# Altium PCB PCB1.PcbDoc
Units mil, origin at the board's own origin, x right, y up, seen from the top; angles counter-clockwise.
Board outline 3815.84 x 3849.16 mil, 2 copper layers (Top Layer, Bottom Layer); 81 components, 56 nets, 312 pads, 294 vias.
Unrouted connection lines stored in the file: 62.
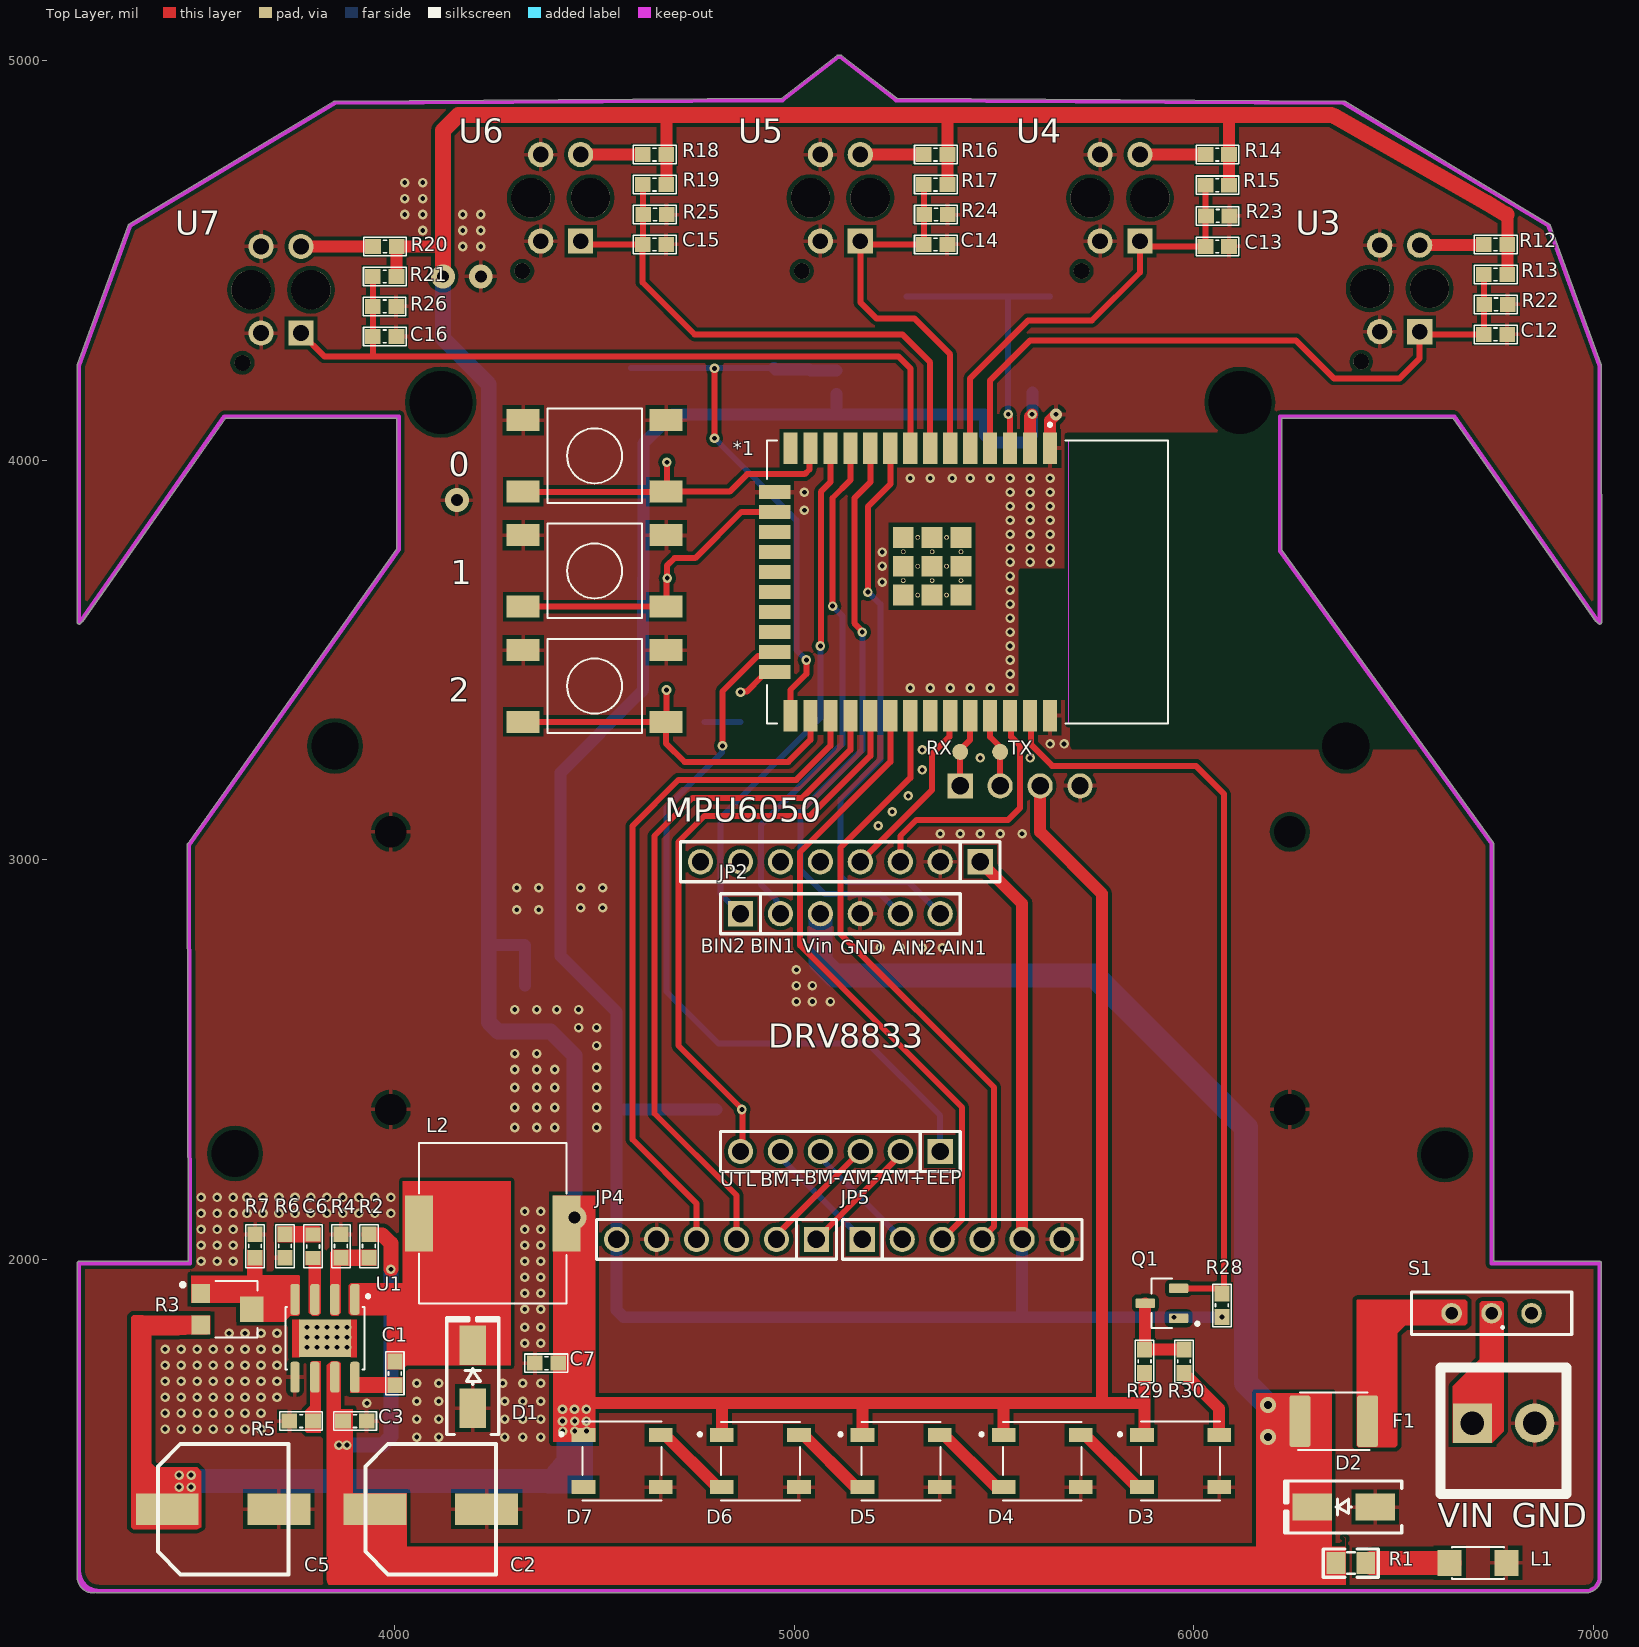
[diagram p0: Top Layer view]
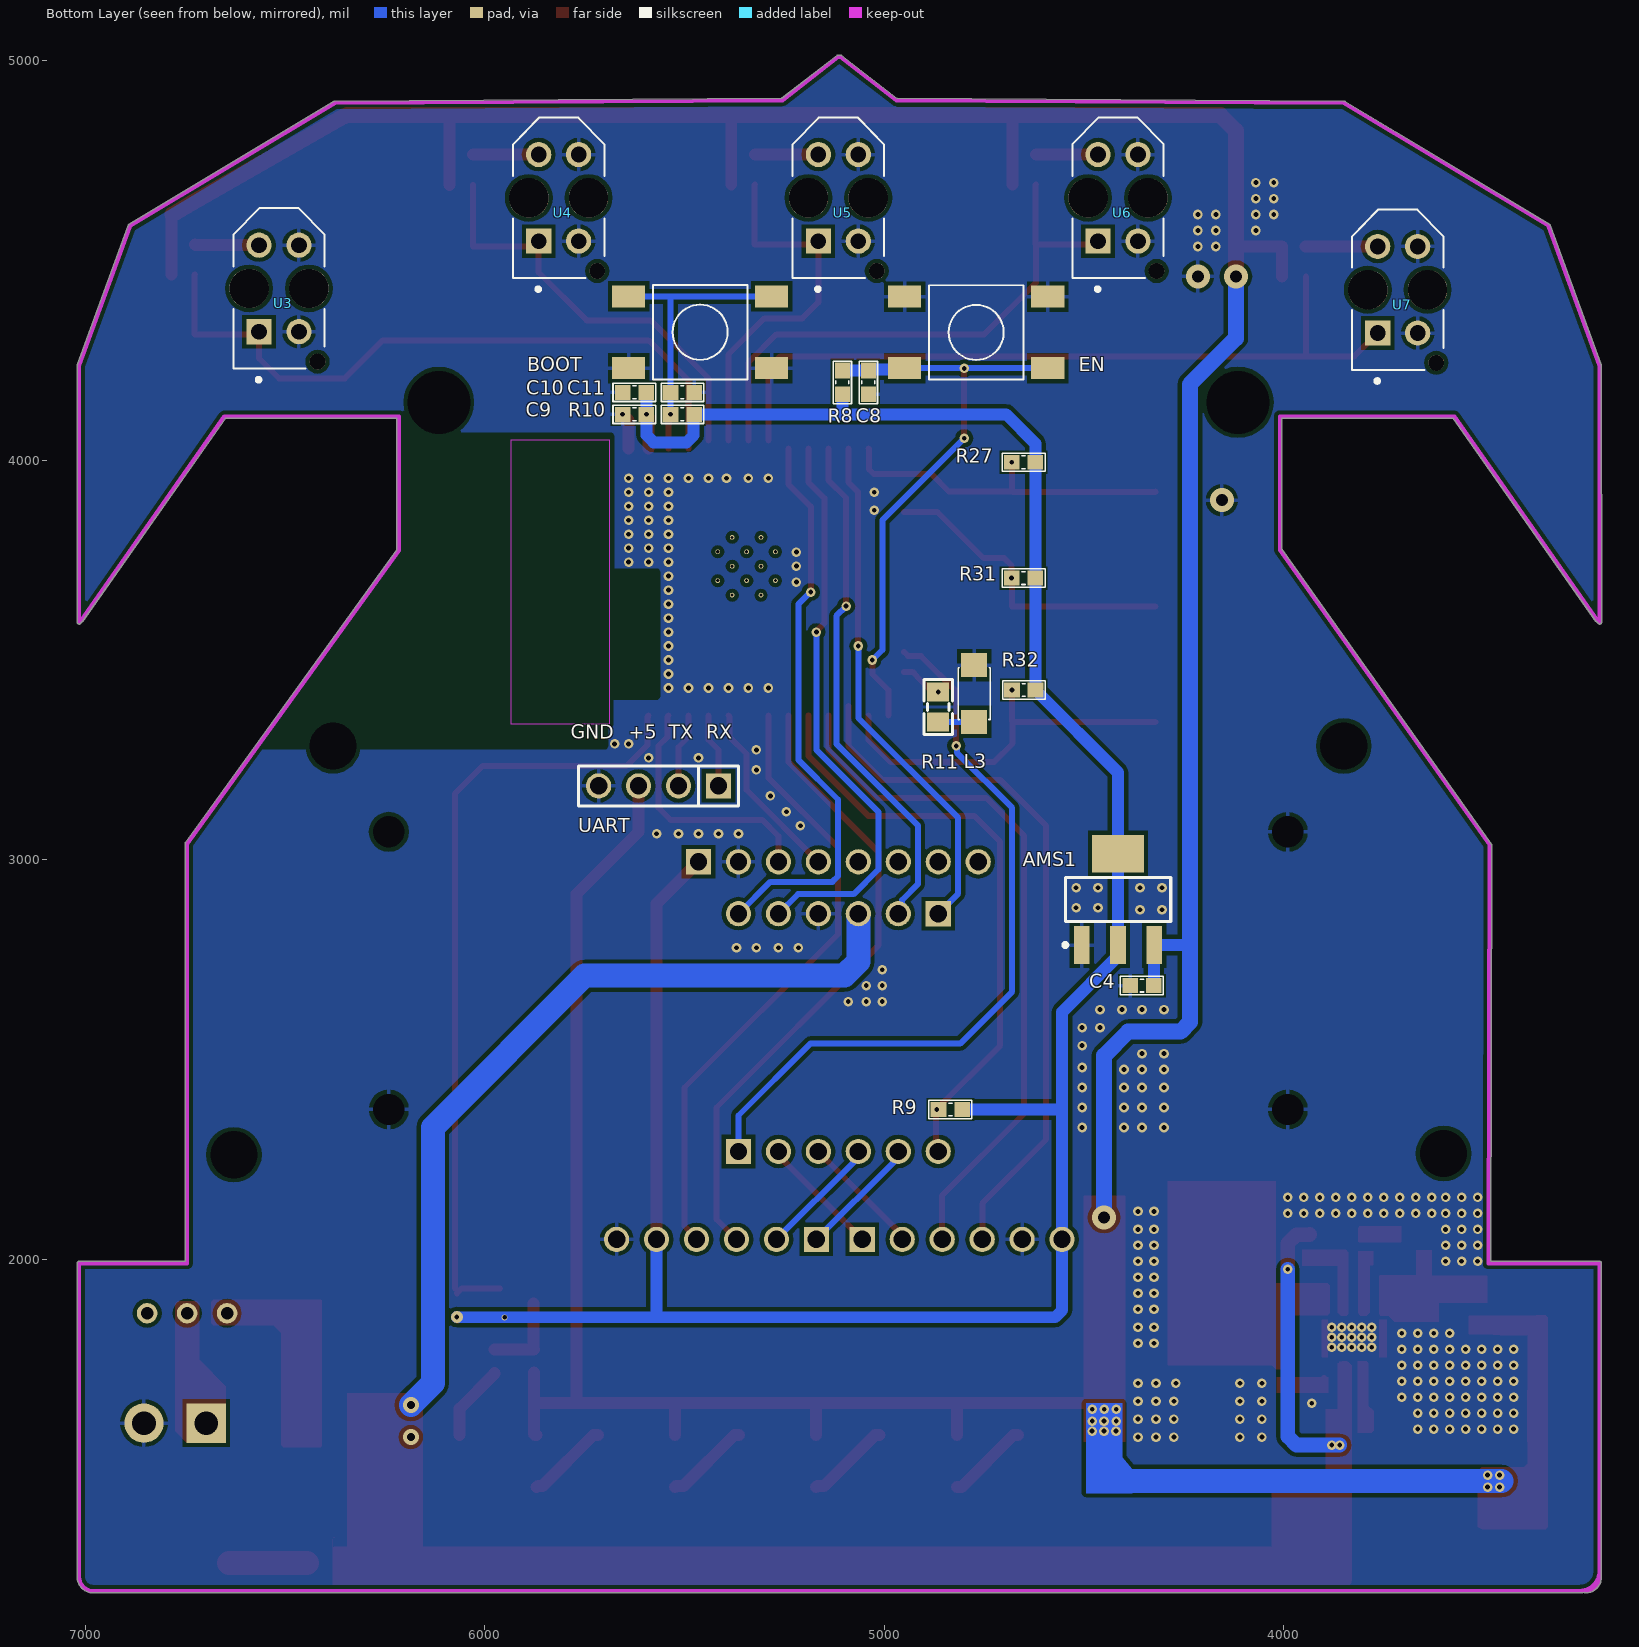
[diagram p1: Bottom Layer view, seen from below]
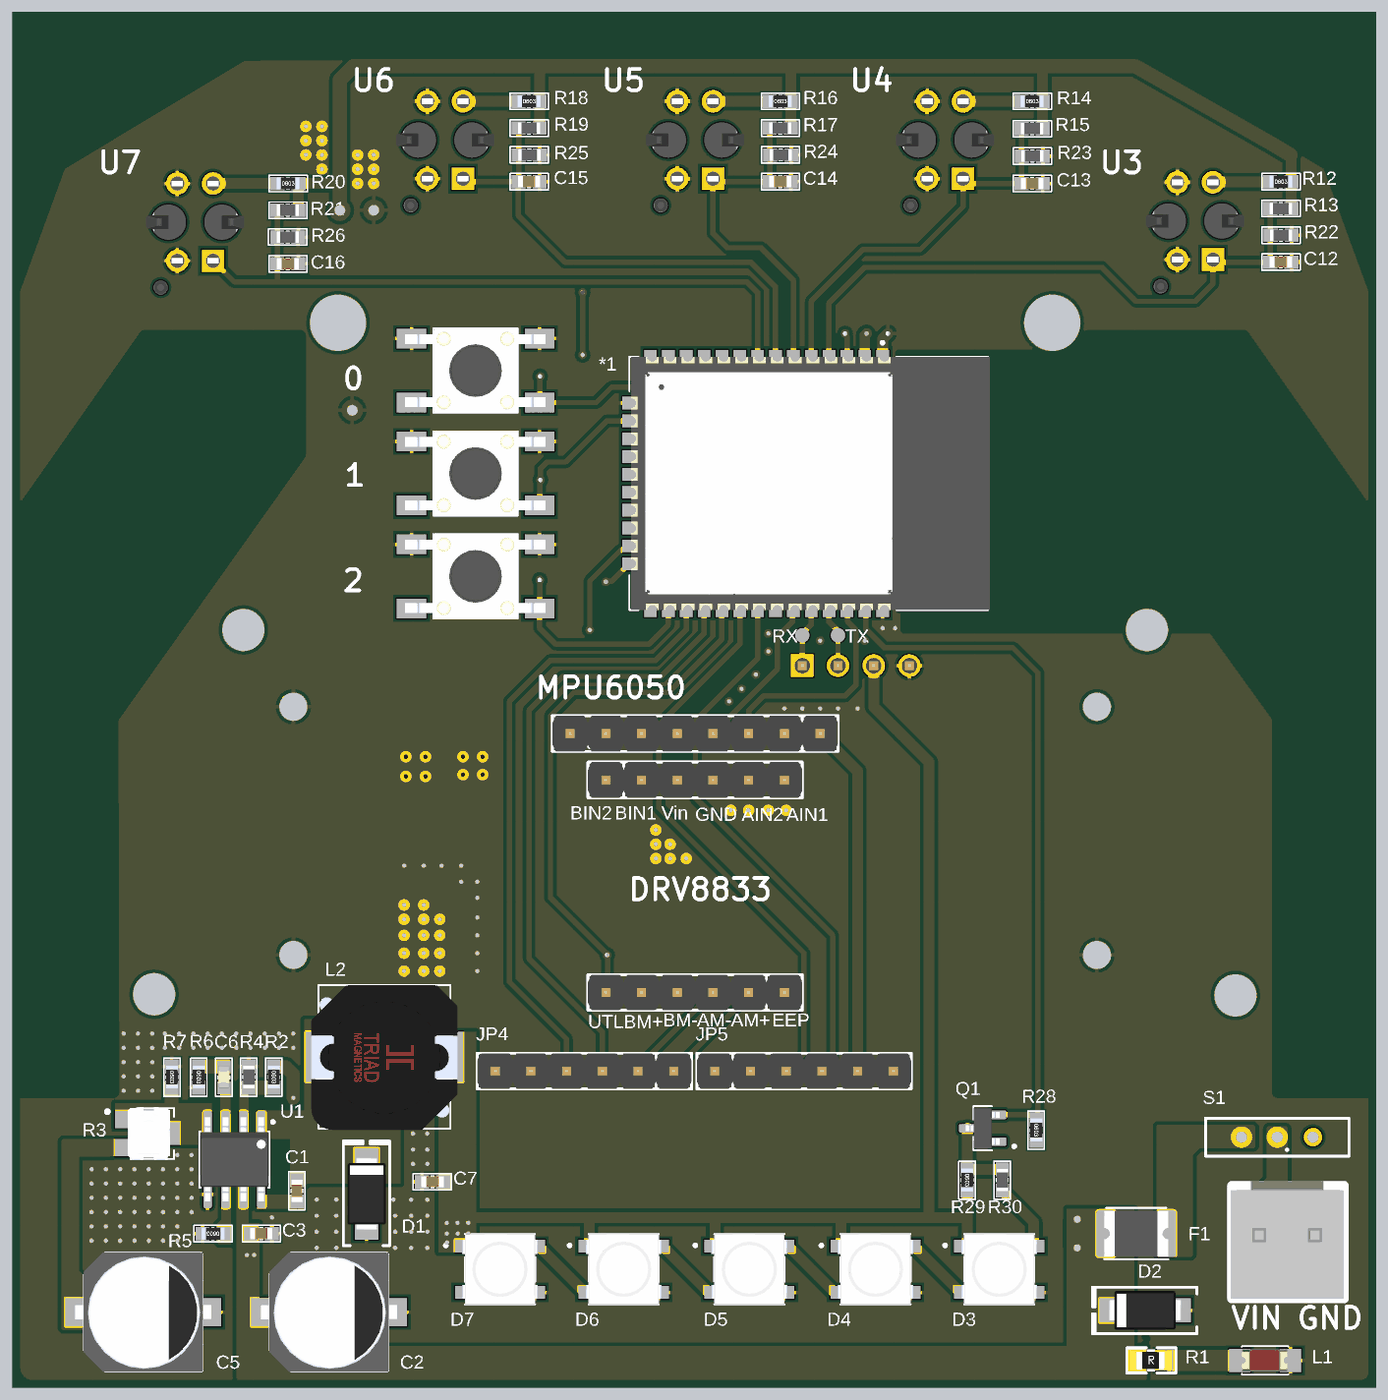
[diagram p2: 3D render of the assembled board from above, using the file's embedded part models]
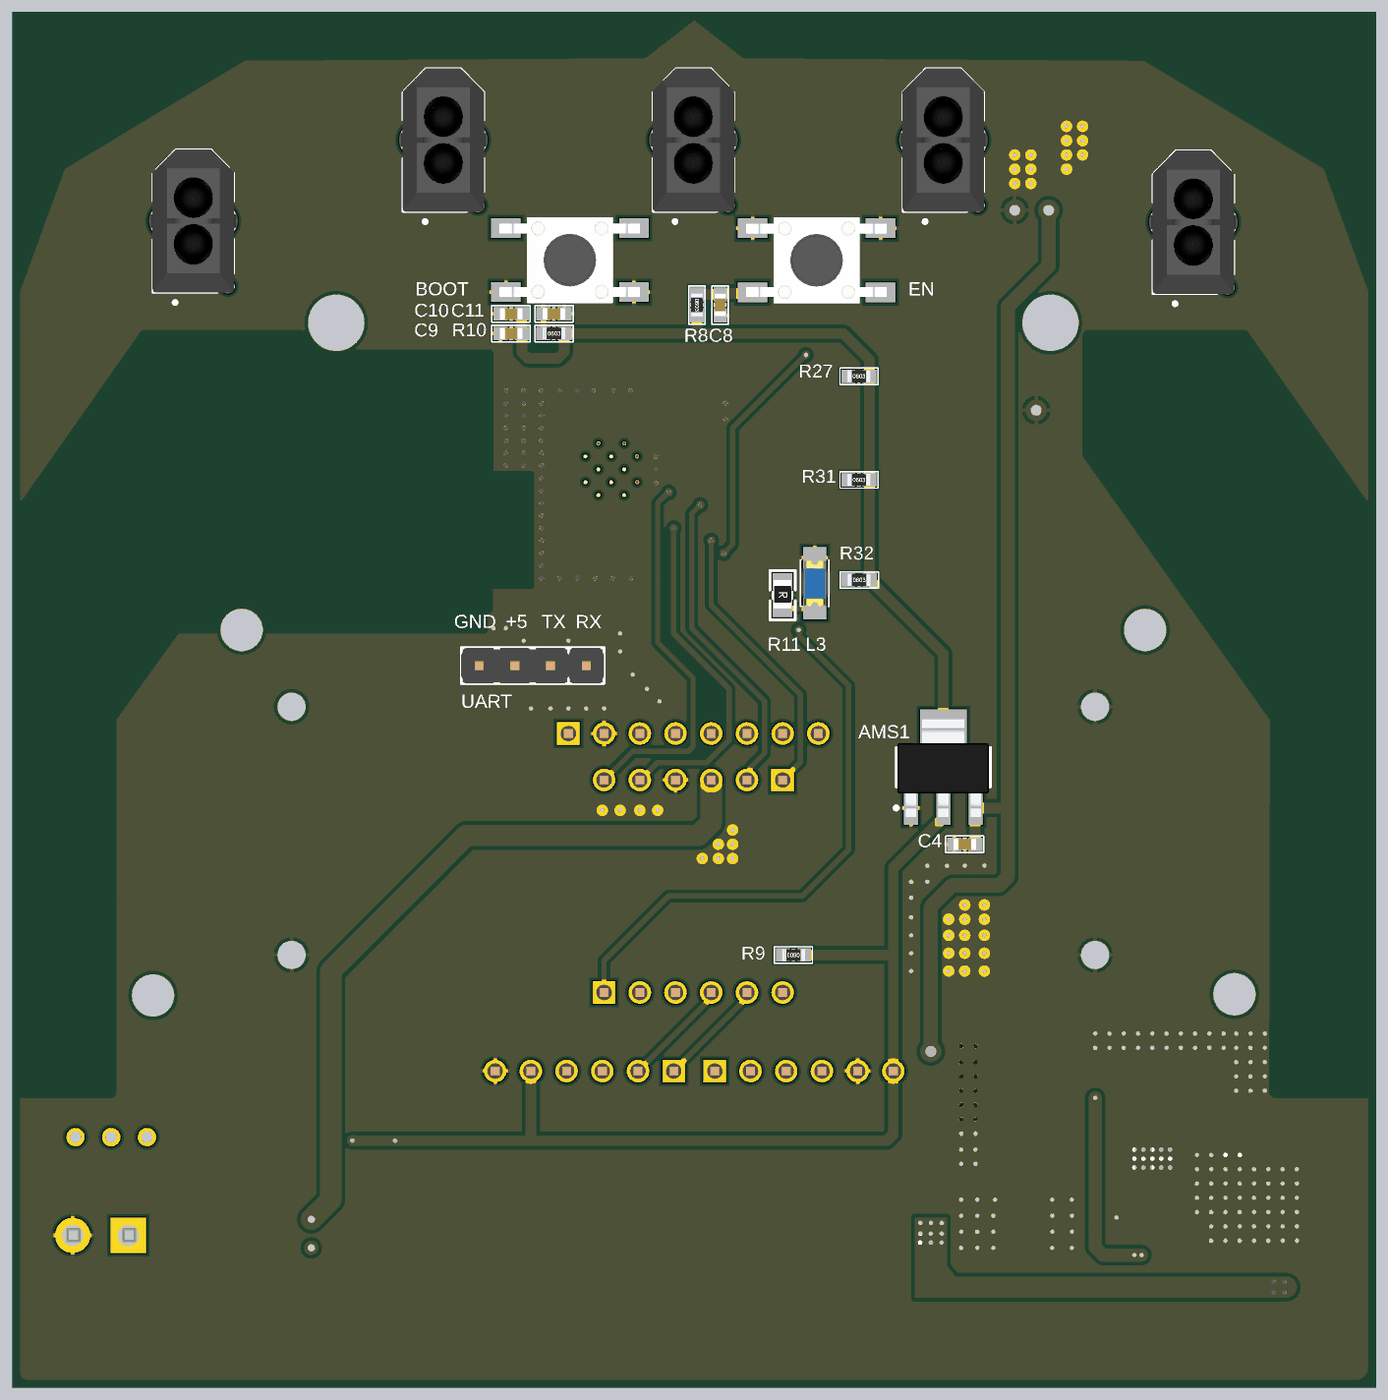
[diagram p3: 3D render of the assembled board from below, using the file's embedded part models]

## Layer stack, top to bottom
Top Solder: solder mask 0.4, Solder Resist, Dk 3.5
Top Layer: signal copper 1.4
Dielectric 1: dielectric 12.6, FR-4, Dk 4.8
Bottom Layer: signal copper 1.4
Bottom Solder: solder mask 0.4, Solder Resist, Dk 3.5

## Board outline
3204.99,1990 cw(c3210,1990) 3210,1995.02 3482.4,1995.02 3480.06,3037.07 cw(c3485.07,3037.09) 3481,3040.01 4004.99,3777.69 4004.99,4104.98 3575.91,4104.69 3219.1,3597.12 cw(c3215,3600) 3214.61,3595 cw(c3209.6,3595) 3204.58,3595 3205.02,4236.61 cw(c3210.03,4236.61) 3205.32,4238.33 3332.99,4588.03 cw(c3337.7,4586.31) 3335.13,4590.61 3846.79,4898.02 cw(c3849.39,4893.72) 3849.36,4898.74 4968.13,4905.52 5106.93,5013.09 cw(c5110.01,5009.13) 5112.5,5013.48 cw(c5114.99,5009.13) 5118.07,5013.09 5256.52,4905.79 6375.17,4899.01 6375.19,4899.01 ccw(c6375.18,4898.84) 6375.17,4899.01 cw(c6375.15,4893.99) 6377.75,4898.29 6889.87,4590.61 cw(c6887.3,4586.31) 6892.01,4588.03 7019.68,4238.33 cw(c7014.97,4236.61) 7019.98,4236.61 7020.42,3595 cw(c7015.4,3595) 7010.39,3595 cw(c7010,3600) 7005.9,3597.12 6649.09,4104.69 6220.02,4104.98 6220.02,3775.73 6749.07,3042.94 cw(c6745,3040) 6750.02,3040 6750.02,1995.02 7015,1995.02 cw(c7015,1990) 7020.02,1990 cw(c7016.81,1989.99) 7020.01,1989.94 7020.01,1205 ccw(c7015,1205.03) 7020.01,1205.06 7020.02,1205 cw(c6980,1205) 6987.6,1165.71 cw(c6985,1170) 6985,1164.98 3260,1164.98 cw(c3260,1220) 3248.32,1166.24 cw(c3245,1170) 3245,1164.98 cw(c3245,1205) 3204.99,1205

## Design rules (kind name [scope] priority, off if disabled: settings)
Clearance [All] p1: gap=10 ignorepadtopadclearanceinfootprint=FALSE except(0: Arc-Hole Track-Hole SMDPad-Hole THPad-Hole Via-Hole Fill-Hole Poly-Hole Region-Hole Text-Hole)
PolygonConnect [All] p1: connectstyle=Relief reliefconductorwidth=10 reliefentries=4 polygonreliefangle="90 Angle" airgapwidth=10
RoutingVias RoutingVias_1 [All] p1: holewidth=12 width=24 viastyle="Through Hole" minholewidth=8 minwidth=10 maxholewidth=12 maxwidth=30
SolderMaskExpansion [All] p1: expansion=4 istentingtop=FALSE
Width [All] p1: maxlimit=60 minlimit=15 preferedwidth=30
30 further rules are at their usual default settings.

## Components (designator, comment, footprint, x,y, rotation, side; value= is the part's Value field where it differs from the comment)
0 "SW" "SW4 - SMD" 4500,4011.13 r180 top value="Button chip 4 pin" (schematic designator SW3)
1 "SW" "SW4 - SMD" 4500,3723.06 r180 top value="Button chip 4 pin" (schematic designator SW4)
2 "SW" "SW4 - SMD" 4500,3435 r180 top value="Button chip 4 pin" (schematic designator SW5)
*1 "ESP32 WROOM 32" ESP32-WROOM-32D 5432.91,3695.35 r270 top
AMS1 "AMS1117-3.3V" SOT223 4415,2900.83 r180 bottom value="AMS1117-3.3V SOT223"
BOOT "SW" "SW4 - SMD" 5460.87,4320.43 r0 bottom value="Button chip 4 pin" (schematic designator SW2)
C1 "104" "tu 0603" 4000,1714.53 r90 top
C2 "220uF" "tu nhom 8 (f)" 4090,1375 r0 top
C3 "106" "tu 0603" 3900,1595 r0 top
C4 "106" "tu 0603" 4355,2685 r0 bottom
C5 "220uF" "tu nhom 8 (f)" 3570,1375 r0 top
C6 "150pF" "Cap 0603" 3795,2032.59 r90 top
C7 "106" "tu 0603" 4379.53,1740 r180 top
C8 "104" "tu 0603" 5040,4195 r270 bottom
C9 "106" "tu 0603" 5625,4115 r0 bottom
C10 "104" "tu 0603" 5625,4170 r0 bottom
C11 "104" "tu 0603" 5505.47,4170 r180 bottom
C12 "104" "tu 0603" 6755,4315 r0 top
C13 "104" "tu 0603" 6058.53,4535 r0 top
C14 "104" "tu 0603" 5353.53,4540 r0 top
C15 "104" "tu 0603" 4650,4540 r0 top
C16 "104" "tu 0603" 3974.53,4310 r0 top
D1 "SS34" "DIODE SMA" 4195,1706.26 r90 top
D2 "SS34" "DIODE SMA" 6375,1380 r180 top
D3 "ADA1655" LED_ADA1655 5966.46,1495.04 r0 top
D4 "ADA1655" LED_ADA1655 5620,1495 r0 top
D5 "ADA1655" LED_ADA1655 5266.95,1495 r0 top
D6 "ADA1655" LED_ADA1655 4915,1495 r0 top
D7 "ADA1655" LED_ADA1655 4568.54,1495.04 r0 top
DRV8833 "8833A" "JP 1x6 DT" 5365,2270 r180 top (schematic designator JP1)
EN "SW" "SW4 - SMD" 4770,4320 r180 bottom value="Button chip 4 pin" (schematic designator SW1)
F1 "2A 24V" "Cau chi tu phuc hoi 2A 24V SMD1812" 6350,1595 r180 top
H? "Header 2P VH3.96 Duc Thang" VH3.96M-2 6775,1590 r0 top
JP2 "8833B" "JP 1x6 DT" 4865,2865 r0 top
JP4 "EncoderA" "JP 1x6 DT" 5055,2050 r180 top
JP5 "EncoderB" "JP 1x6 DT" 5170,2050 r0 top
L1 "LED 0805" LED-1206-Red 6640,1240 r0 top
L2 "MSS1038-153MLC" IND_370_401_140X70_SMD 4059.92,2090 r90 top
L3 "LED 1206" LED-1206-Blue 4775,3345 r90 bottom
MPU6050 "mpu6050" "JP 1x8 DT" 5465,2995 r180 top (schematic designator JP?)
Q1 "BSS138" SOT95P240X111-3N 5920,1890 r180 top
R1 "1k" "tro smd 0805" 6392.43,1242.39 r0 top
R2 "100k" "tro smd 0603" 3935,2033.29 r270 top
R3 "TC33X-2-104E" TRIM_TC33X-2-502G 3585,1875 r0 top
R4 "30k" "RES 0603" 3865,2033.29 r270 top
R5 "100k" "tro smd 0603" 3765.47,1595 r180 top
R6 "100k" "tro smd 0603" 3725,2033.29 r270 top
R7 "10k" "tro smd 0603" 3650,2033.29 r270 top
R8 "10k" "tro smd 0603" 5105,4195 r270 bottom
R9 "10k" "tro smd 0603" 4834.53,2375 r0 bottom
R10 "10k" "tro smd 0603" 5505.47,4115 r180 bottom
R11 "330R" "Tro SMD 0805" 4862.61,3382.57 r270 bottom
R12 "330R" "tro smd 0603" 6755,4540 r0 top
R13 "5.1k" "RES 0603" 6755,4465 r0 top
R14 "330R" "tro smd 0603" 6058.53,4765 r0 top
R15 "5.1k" "RES 0603" 6058.53,4688.33 r0 top
R16 "330R" "tro smd 0603" 5353.53,4765 r0 top
R17 "5.1k" "RES 0603" 5353.53,4690 r0 top
R18 "330R" "tro smd 0603" 4650,4765 r0 top
R19 "5.1k" "RES 0603" 4650,4690 r0 top
R20 "330R" "tro smd 0603" 3975,4535 r0 top
R21 "5.1k" "RES 0603" 3974.53,4460 r0 top
R22 "9.1k" "RES 0603" 6756,4390 r180 top
R23 "9.1k" "RES 0603" 6059.53,4611.67 r180 top
R24 "9.1k" "RES 0603" 5354.53,4615 r180 top
R25 "9.1k" "RES 0603" 4651,4615 r180 top
R26 "9.1k" "RES 0603" 3974.53,4385 r180 top
R27 "10k" "tro smd 0603" 4651.42,3995 r180 bottom
R28 "10k" "tro smd 0603" 6070,1885 r270 top
R29 "10k" "tro smd 0603" 5876.5,1744.84 r270 top
R30 "470R" "RES 0603" 5975,1744.84 r270 top
R31 "10k" "tro smd 0603" 4651.42,3705 r180 bottom
R32 "10k" "tro smd 0603" 4650.94,3425 r180 bottom
S1 "450301014042" 450301014042 6745,1865 r180 top
U1 "MP1584EN" SOIC127P600X170-9N 3825,1802.44 r270 top
U3 "TCRT5000L" XDCR_TCRT5000L 6515,4430 r90 bottom
U4 "TCRT5000L" XDCR_TCRT5000L 5815,4656.73 r90 bottom
U5 "TCRT5000L" XDCR_TCRT5000L 5115,4656.73 r90 bottom
U6 "TCRT5000L" XDCR_TCRT5000L 4415,4656.73 r90 bottom
U7 "TCRT5000L" XDCR_TCRT5000L 3715,4426.73 r90 bottom
UART "UART" "JP 1x4 DT" 5415,3185 r0 bottom (schematic designator JP3)

## Footprints (in the part's own frame and the unit in brackets; to place one, negate y for a bottom-side part, rotate by r counter-clockwise, add the part's x,y. Pads: shape width x height; smd on the part's side, far side on the other; paste and mask are expansions set on the pad)
450301014042 [mm]
  round 1.308 hole 0.8: 1(0,0) 2(-2.54,0) 3(2.54,0)
  silkscreen extent -5.1,-1.35 5.1,1.35
"Cap 0603" [mil]
  rect 35x37.4 smd mask+3: 1(-29.83,-0.32) 2(29.23,-0.32)
  silkscreen extent -53,-23 54,23, body extent -30,-16 32,15, height 31
"Cau chi tu phuc hoi 2A 24V SMD1812" [mm]
  rrect25% 1.34x3.29 smd: 1(-2.15,0) 2(2.15,0)
  silkscreen extent -2.28,-1.83 2.28,1.83, body extent -2.27,-1.62 2.27,1.62, height 1.25
"DIODE SMA" [mm] "SMA"
  rect 2.5x1.7 smd: 1(-2,0) 2(2,0)
  silkscreen extent -3.68,-1.65 3.75,1.65, body extent -2.6,-1.37 2.6,1.37, height 2.4
ESP32-WROOM-32D [mm]
  rect 2x0.9 smd: 1(-8.5,5.26) 2(-8.5,3.99) 3(-8.5,2.72) 4(-8.5,1.45) 5(-8.5,0.18) 6(-8.5,-1.09) 7(-8.5,-2.36) 8(-8.5,-3.63) 9(-8.5,-4.9) 10(-8.5,-6.17) 11(-8.5,-7.44) 12(-8.5,-8.71) 13(-8.5,-9.98) 14(-8.5,-11.25) 25(8.5,-11.25) 26(8.5,-9.98) 27(8.5,-8.71) 28(8.5,-7.44) 29(8.5,-6.17) 30(8.5,-4.9) 31(8.5,-3.63) 32(8.5,-2.36) 33(8.5,-1.09) 34(8.5,0.18) 35(8.5,1.45) 36(8.5,2.72) 37(8.5,3.99) 38(8.5,5.26)
  rect 0.9x2 smd: 15(-5.715,-12.25) 16(-4.445,-12.25) 17(-3.175,-12.25) 18(-1.905,-12.25) 19(-0.635,-12.25) 20(0.635,-12.25) 21(1.905,-12.25) 22(3.175,-12.25) 23(4.445,-12.25) 24(5.715,-12.25)
  rect 1.33x1.33 smd: 39(-2.835,-0.405) 39(-2.835,-2.24) 39(-2.835,-4.075) 39(-1,-0.405) 39(-1,-2.24) 39(-1,-4.075) 39(0.835,-0.405) 39(0.835,-2.24) 39(0.835,-4.075)
  round 0.3 hole 0.2: 39(-2.835,-1.322) 39(-2.835,-3.157) 39(-1.917,-0.405) 39(-1.917,-2.24) 39(-1.917,-4.075) 39(-1,-1.322) 39(-1,-3.157) 39(-0.082,-0.405) 39(-0.082,-2.24) 39(-0.082,-4.075) 39(0.835,-1.322) 39(0.835,-3.157)
  Keep-Out Layer region: 9,6.45 -9,6.45 -9,12.75 9,12.75
  Keep-Out Layer region: 9,6.45 -9,6.45 -9,12.75 9,12.75
  silkscreen extent -10.1,-12.75 9,12.75, body extent -9,-12.62 9,12.88, height 3.2
IND_370_401_140X70_SMD [mm] "SMD INDUCTOR"
  rect 3.56x1.78 smd: 1(0,0) 2(0,-9.4)
  silkscreen extent -5.1,-9.4 5.1,0, body extent -5.2,-9.9 5.1,0.5, height 4.01
"JP 1x4 DT" [mm] "4 pins, 1 row, straight, gold plating"
  rect 1.6x1.6 hole 1.1: 1(0,0)
  round 1.6 hole 1.1: 2(2.54,0) 3(5.08,0) 4(7.62,0)
  silkscreen extent -1.27,-1.27 8.89,1.27, body extent -1.27,-1.27 8.89,1.27, height 8.54
"JP 1x6 DT" [mm] "6 pins, 1 row, straight, gold plating"
  rect 1.6x1.6 hole 1.1: 1(0,0)
  round 1.6 hole 1.1: 2(2.54,0) 3(5.08,0) 4(7.62,0) 5(10.16,0) 6(12.7,0)
  silkscreen extent -1.27,-1.27 13.97,1.27, body extent -1.27,-1.27 13.97,1.27, height 8.54
"JP 1x8 DT" [mm] "8 pins, 1 row, straight, gold plating"
  rect 1.6x1.6 hole 1.1: 1(0,0)
  round 1.6 hole 1.1: 2(2.54,0) 3(5.08,0) 4(7.62,0) 5(10.16,0) 6(12.7,0) 7(15.24,0) 8(17.78,0)
  silkscreen extent -1.27,-1.27 19.05,1.27, body extent -1.27,-1.27 19.05,1.27, height 8.54
LED-1206-Blue [mil] "Compoment SMD 120x60mil"
  rect 60x65 smd: 1(0,0) 2(142,0)
  silkscreen extent 6,-40 136,40, body extent 7,-31 133,31, height 43
LED-1206-Red [mil]
  rect 60x65 smd: 1(0,0) 2(142,0)
  silkscreen extent 6,-40 136,40, body extent 7,-31 133,31, height 43
LED_ADA1655 [mm]
  rect 1.5x0.9 smd: 1(-2.45,1.65) 2(-2.45,-1.65) 3(2.45,-1.65) 4(2.45,1.65)
  silkscreen extent -3.95,-2.5 2.5,2.5, body extent -2.7,-2.5 2.7,2.5, height 1.5
"RES 0603" [mm] "RES 0603"
  rect 1x0.95 smd mask+0.076: 1(-0.75,0) 2(0.75,0)
  silkscreen extent -1.35,-0.58 1.37,0.58, body extent -0.8,-0.4 0.8,0.4, height 0.45
SOIC127P600X170-9N [mm]
  rrect54% 1.97x0.6 smd: 1(-2.475,1.905) 2(-2.475,0.635) 3(-2.475,-0.635) 4(-2.475,-1.905) 5(2.475,-1.905) 6(2.475,-0.635) 7(2.475,0.635) 8(2.475,1.905)
  rect 2.41x3.3 smd paste-3: 9(0,0)
  silkscreen extent -2.77,-2.5 2,2.84, body extent -3,-2.45 3,2.45, height 1.7
SOT95P240X111-3N [mm]
  rrect25% 1.23x0.6 smd: 1(-1.06,0.95) 2(-1.06,-0.95) 3(1.06,0)
  silkscreen extent -2.35,-1.57 0.65,1.57, body extent -1.2,-1.45 1.2,1.45, height 1.11
SOT223 [mm]
  rect 1x2.4 smd: 1(-2.3,-2.9) 2(0,-2.9) 3(2.3,-2.9)
  rect 3.3x2.4 smd: 4(0,2.9)
  silkscreen extent -3.48,-3.02 3.35,1.4, body extent -3.25,-3.56 3.25,3.4, height 1.68
"SW4 - SMD" [mm] "SW button 4pin, 250 x250 mil"
  rect 2.1x1.4 smd: 1(-4.55,2.275) 2(4.55,-2.275) 3(4.55,2.275) 4(-4.55,-2.275)
  silkscreen extent -3,-3 3,3, body extent -5,-3 5,3, height 5.11
TRIM_TC33X-2-502G [mm]
  rect 1.2x1.2 smd: 1(-1.8,1) 3(-1.8,-1)
  rect 1.5x1.6 smd: 2(1.45,0)
  silkscreen extent -3.07,-1.8 1.8,1.8, body extent -1.5,-1.9 1.5,1.9, height 1.1
"tro smd 0603" [mm] "Chip Capacitor, 2-Leads, Body 1,60x0,80mm, IPC Medium Density"
  rect 1x0.95 smd mask+0.076: 1(-0.75,0) 2(0.75,0)
  silkscreen extent -1.35,-0.58 1.37,0.58, body extent -0.82,-0.42 0.82,0.43, height 0.44
"tro smd 0805" [mm]
  rect 1.2x1.4 smd: 1(-0.946,-0.061) 2(0.954,-0.061)
  silkscreen extent -1.75,-0.97 1.75,0.84, body extent -1.56,-0.76 1.44,0.64, height 0.53
"Tro SMD 0805" [mm]
  rect 1.2x1.4 smd: 1(-0.946,-0.061) 2(0.954,-0.061)
  silkscreen extent -1.75,-0.97 1.75,0.84, body extent -1.56,-0.76 1.44,0.64, height 0.53
"tu 0603" [mm] "Chip Capacitor, 2-Leads, Body 1,60x0,80mm, IPC Medium Density"
  rect 1x0.95 smd mask+0.076: 1(-0.75,0) 2(0.75,0)
  silkscreen extent -1.35,-0.58 1.37,0.58, body extent -0.8,-0.4 0.8,0.4, height 0.9
"tu nhom 8 (f)" [mm]
  rect 4x2 smd: 1(-3.55,0) 2(3.55,0)
  silkscreen extent -4.15,-4.15 4.15,4.15, body extent -4.85,-4.25 4.85,4.25, height 10.5
VH3.96M-2 [mm]
  rect 2.5x2.5 hole 1.5: 1(-1.98,0)
  round 2.5 hole 1.5: 2(1.98,0)
  silkscreen extent -4,-4.5 4,3.54, body extent -4.08,-4.49 3.96,3.88, height 10.26
XDCR_TCRT5000L [mm]
  rect 1.6x1.6 / inner round 1.6 / far side rect 1.6x1.6 hole 1: 1(-2.75,1.27)
  round 1.6 hole 1: 2(-2.75,-1.27) 3(2.75,-1.27) 4(2.75,1.27)
  round 1 hole 1 unplated: ""(-4.65,-2.45)
  round 2.5 hole 2.5 unplated: ""(0,-1.9) ""(0,1.9)
  silkscreen extent -5.92,-2.9 5.1,2.9, body extent -5.1,-3.5 5.1,3.5, height 7.2

## Part data
0 1 2 BOOT EN: library part SW4, "Switch button 4 pin"
AMS1: library part "AMS1117 SMD", "Dán", Chung_Loai=Dán, Don_Vi=Con, Ma_Hang=MH000596
C1 C8 C10 C11 C12 C13 C14 C15 C16: library part "Tu 0603 104 50V 10%", "Dán", Chung_Loai=Dán, Don_Vi=Con, Ma_Hang=MH004568, So_Chan=2, Ten_Linh_Kien="Tụ 0603 104-100nF 10% 50V"
C2 C5: library part "Tu Nhom 220uF 25V", "Dán", Chung_Loai=Dán, Don_Vi=Con, Ma_Hang=MH002221, So_Chan=2, Ten_Linh_Kien="Tụ Nhôm 220uF 25V"
C3 C4 C7 C9: library part "Tu 0603 106 16V 20%", "Dán", Chung_Loai=Dán, Don_Vi=Con, Ma_Hang=MH004848, So_Chan=2, Ten_Linh_Kien="Tụ 0603-10uF 20% 16V"
C6: library part "Tu 0805 15pF 50V 10%", "Dán", Chung_Loai=Dán, Don_Vi=Con, Ma_Hang=MH004556, So_Chan=2, Ten_Linh_Kien="Tụ 0805 15P 10% 50V"
D1 D2: library part "Diode SS34 ( 1N5822 )", "Dán", Chung_Loai=Dán, Don_Vi=Con, Ma_Hang=MH002104, Ten_Linh_Kien="Diode SS34 3A 40V SMA ( 1N5822 SS34A)"
D3 D4 D5 D6 D7: "WS2812B 5050 RGB LED with Integrated Driver Chip - 10 Pack", Package="5050 Worldsemi", Availability="No availability data", Check_prices=https://www.snapeda.com/parts/ADA1655/Adafruit%20Industries/view-part/48810/?ref=eda, MF="Adafruit Industries", MP=ADA1655, Price=None, SnapEDA_Link=https://www.snapeda.com/parts/ADA1655/Adafruit%20Industries/view-part/48810/?ref=snap
DRV8833 JP2 JP4 JP5: library part "JP 1x6 2.54 Duc Thang", "Cắm", Chung_Loai=Cắm, Don_Vi=Con, Ma_Hang=MH000903, Ten_Linh_Kien="Jump Đơn Đực 2.54MM 1x40P Thẳng 11MM"
F1: library part "Cau chi tu phuc hoi 2A 24V SMD1812", "2A 24V SMD1812", Ma_Hang=MH010033, Ten="Cầu Chì Tự Phục Hồi 2A 24V SMD1812"
H?: "Cắm", Chung_Loai=Cắm, Don_Vi=Con, Ma_Hang=MH001283, Ten_Linh_Kien="Header 2P XH2.54-2P Đực Thẳng"
L1: library part "LED 1206 Do", "Dán", Chung_Loai=Dán, Don_Vi=Con, Ma_Hang=MH002334, Ten_Linh_Kien="LED1206 Màu Đỏ (Red)"
L2: library part IND_15uH-3.8A-30%-SMD, "Fixed Inductors MSS1038 SMT Shielded 15 uH 20 % 3.8 A", Alternate Part Number-1=NA, Case/Package=SMD, Manufacturer=Bourns, Manufacturer Part Number=MSS1038-153MLC, Supplier Part Number-1=MSS1038-153MLC, Supplier-1="COILCRAFT SAMPLE"
L3: library part "LED 1206 Xanh Duong", "Dán", Chung_Loai=Dán, Don_Vi=Con, Ma_Hang=MH002333, Ten_Linh_Kien="LED1206 Màu Xanh Dương (Blue)"
MPU6050: library part "JP 1x8 2.54 Duc Thang", "Cắm", Chung_Loai=Cắm, Don_Vi=Con, Ma_Hang=MH000903, Ten_Linh_Kien="Jump Đơn Đực 2.54MM 1x40P Thẳng 11MM"
Q1: "N-Channel 50 V 220mA (Ta) 350mW (Ta) Surface Mount SOT-23-3", Package="SOT-23-3 ON Semiconductor", Check_prices=https://www.snapeda.com/parts/BSS138/Onsemi/view-part/?ref=eda, MF=onsemi, MP=BSS138, SnapEDA_Link=https://www.snapeda.com/parts/BSS138/Onsemi/view-part/?ref=snap
R1: library part "Tro 0805 1% 1k", "Dán", Chung_Loai=Dán, Don_Vi=Con, Ma_Hang=MH005468, So_Chan=2, Ten_Linh_Kien="Trở 0805 1% 1k"
R2 R5 R6: library part "Tro 0603 5% 100k", "Dán", Chung_Loai=Dán, Don_Vi=Con, Ma_Hang=MH006314, So_Chan=2, Ten_Linh_Kien="Trở 0603 5% 100k"
R3: library part TC33X-2-502G, "5 kOhms 0.1W, 1/10W J Lead Surface Mount Trimmer Potentiometer Cermet 1 Turn Top Adjustment", Package="SOD-23 Bourns", Check_prices=https://www.snapeda.com/parts/TC33X-2-502G/Bourns/view-part/1439711/?ref=eda, Digi-Key_Part_Number=TC33X-2-502GCT-ND, MF=Bourns, MP=TC33X-2-502G, Purchase-URL=https://pricing.snapeda.com/search/part/TC33X-2-502G/?ref=eda, SnapEDA_Link=https://www.snapeda.com/parts/TC33X-2-502G/Bourns/view-part/1439711/?ref=snap
R4: library part "Tro 0805 5% 30k", "Dán", Chung_Loai=Dán, Don_Vi=Con, Ma_Hang=MH005314, So_Chan=2, Ten_Linh_Kien="Trở 0805 5% 30k"
R7 R8 R9 R10 R27 R28 R29 R31 R32: library part "Tro 0603 5% 10k", "Dán", Chung_Loai=Dán, Don_Vi=Con, Ma_Hang=MH006316, So_Chan=2, Ten_Linh_Kien="Trở 0603 5% 10k"
R11: library part "Tro 0805 5% 330R", "Dán", Chung_Loai=Dán, Don_Vi=Con, Ma_Hang=MH005337, So_Chan=2, Ten_Linh_Kien="Trở 0805 5% 330R"
R12 R14 R16 R18 R20: library part "Tro 0603 5% 330R", "Dán", Chung_Loai=Dán, Don_Vi=Con, Ma_Hang=MH006910, So_Chan=2, Ten_Linh_Kien="Trở 0603 5% 330R"
R13 R15 R17 R19 R21: library part "Tro 0805 1% 5.1k", "Dán", Chung_Loai=Dán, Don_Vi=Con, Ma_Hang=MH008812, So_Chan=2, Ten_Linh_Kien="Trở 0805 1% 5.1k"
R22 R23 R24 R25 R26: library part "Tro 0805 1% 9.1k", "Dán", Chung_Loai=Dán, Don_Vi=Con, Ma_Hang=MH008813, So_Chan=2, Ten_Linh_Kien="Trở 0805 1% 9.1k"
R30: library part "Tro 0805 5% 470R", "Dán", Chung_Loai=Dán, Don_Vi=Con, Ma_Hang=MH005341, So_Chan=2, Ten_Linh_Kien="Trở 0805 5% 470R"
S1: Package=None, Availability=Unavailable, MF="{'manufacturer': u'W\xfcrth Elektronik'}", MP=450301014042, Price=None
U1: "Buck Switching Regulator IC Positive Adjustable 0.8V 1 Output 3A 8-SOIC (0.154, 3.90mm Width) Exposed Pad", Package="SOIC-8 Monolithic Power", Availability="In Stock", Check_prices=https://www.snapeda.com/parts/MP1584EN/Monolithic+Power+Systems+Inc./view-part/?ref=eda, MF="Monolithic Power", MP=MP1584EN, Price=None, Purchase-URL=https://pricing.snapeda.com/search/part/MP1584EN/?ref=eda, SnapEDA_Link=https://www.snapeda.com/parts/MP1584EN/Monolithic+Power+Systems+Inc./view-part/?ref=snap
U3 U4 U5 U6 U7: "Reflective Optical Sensor 0.591 (15mm) PCB Mount", Package=None, Check_prices=https://www.snapeda.com/parts/TCRT5000L/Vishay/view-part/?ref=eda, MF="Vishay Semiconductor", MP=TCRT5000L, SnapEDA_Link=https://www.snapeda.com/parts/TCRT5000L/Vishay/view-part/?ref=snap
UART: library part "JP 1x4 2.54 Duc Thang", "Cắm", Chung_Loai=Cắm, Don_Vi=Con, Ma_Hang=MH000903, Ten_Linh_Kien="Jump Đơn Đực 2.54MM 1x40P Thẳng 11MM"

## Free pads (board coordinates)
  round 40 smd: 3(5415,3270) 6(5515,3270)
  round 100 hole 157.48: 11(6115,4145) 12(4115,4145)
  round 100 hole 118.11: 13(3600,2265) 13(3850,3285) 13(6627.96,2261.78) 14(6380,3285)
  oval 2x0 hole 78.74: 16(3990,2375) 16(3990,3070) 16(6240,2375) 16(6240,3070)

## Via types
v1: diameter 24, hole 12, Top Layer to Bottom Layer, tented both sides, 240 vias
v2: diameter 24, hole 12, Top Layer to Bottom Layer, 45 vias
v3: diameter 60, hole 30, Top Layer to Bottom Layer, tented both sides, 4 vias
v4: diameter 30, hole 12, Top Layer to Bottom Layer, tented both sides, 2 vias
v5: diameter 40, hole 20, Top Layer to Bottom Layer, tented both sides, 2 vias
v6: diameter 15, hole 12, Top Layer to Bottom Layer, tented both sides, 1 vias

## Nets (pads, with @x,y where several pads share a name; then routed paths per layer and width w, separated by ;. In a path a pad name is that pad's centre, name@x,y a point inside that pad or via, vN(x,y) a via of type N, cw(c..) or ccw(c..) an arc to the next point about the centre after c; other vN are vias at no path point)
3V3: *1.2 AMS1.2 AMS1.4 C9.1 C10.1 JP4.6 JP5.5 MPU6050.1 Q1.1 R8.2 R9.1 R10.2 R27.2 R28.2 R31.2 R32.2 | length 6599.7
  Top Layer w15: v6(5950,1855) 5950.2,1855 5952.6,1852.6 Q1.1
  Top Layer w30: MPU6050.1 5570,2890 JP5.5 ; *1.2 5590,4110 v1(5595,4115) ; R28.2@6068.56,1854.04 v4(6070,1855.47)
  Bottom Layer w30: R9.1 4555,2375 ; R8.2 5105,4115 ; 5570,1855 JP5.5 ; v1(5595,4115) 5595,4062.57 5577.43,4045 5494.5,4045 5476.93,4062.57 5476.93,4115 5105,4115 ; C9.1 C10.1 ; v4(6070,1855.47) 6069.53,1855 v6(5950,1855) 4572.57,1855 4555,1872.57 4555,2375 ; 4555,2375 4555,2619.09 4415,2759.09 AMS1.2 AMS1.4 4415,3218.58 4616.73,3420.31 4616.73,3421.3 4620.43,3425 R32.2 4621.65,3425.24 4621.65,3704.76 R31.2 R27.2 4621.89,4041.89 4695,4115 5105,4115
+5: AMS1.3 C4.1 C5.1 C7.1 D3.1 D4.1 D5.1 D6.1 D7.1 L2.2 R3.3 R12.2 R13.2 R14.2 R15.2 R16.2 R17.2 R18.2 R19.2 R20.2 R21.2 R29.2 UART.3 | length 11443.8
  Top Layer w15: v1(3460,1430) v1(3490,1430) v1(3490,1460) v1(3460,1460) ; v1(4419.53,1595) 4449.53,1595 4449.53,1570.22 4459.74,1560 D7.1@4466.61,1560
  Top Layer w30: R21.2 4004.29,4460.24 4004.29,4534.76 R20.2 4115,4535 4120,4540 ; v1(4419.53,1625) v1(4449.53,1625) v1(4479.53,1625) ; 4454.53,1655.36 4454.53,1700 ; v1@4478.31,1631.69 4486.61,1640 4820,1640 ; 4675,4864 4679.53,4859.47 R18.2 R19.2 ; D6.1 4818.54,1638.54 4820,1640 ; D5.1 5170.49,1639.51 5170,1640 ; R17.2 R16.2 5383.06,4862.05 5385,4864 ; D4.1 5523.54,1636.46 5520,1640 ; UART.3 5615,3070 5770,2915 5770,1640 ; D3.1 5873.79,1560 5876.5,1562.72 5876.5,1638.5 ; R29.2@5876.5,1716.3 R29.2 5876.5,1638.5 ; R15.2 R14.2 6088.06,4862.05 6090,4864 ; 6781.81,4614.69 6784.53,4611.97 R12.2 R13.2 ; 4820,1640 5170,1640 ; 5170,1640 5520,1640 ; 5520,1640 5770,1640 ; 5770,1640 5875,1640 5876.5,1638.5
  Top Layer w40: v3(4120,4460) 4120,4540 4120,4825 4159,4864 4675,4864 5385,4864 6090,4864 6338.54,4864 cw(c6338.54,4834) 6353.37,4860.07 6730.76,4645.35 6730.81,4645.32 cw(c6715.93,4619.27) 6731.38,4644.99 6781.81,4614.69
  Bottom Layer w30: 4230,2786.65 4235,2786.65 AMS1.3 ; C4.1 AMS1.3@4325.47,2785.63
  Bottom Layer w40: v3(4120,4460) 4120,4305 4235,4190 4235,2786.65 4235,2593.43 4258.43,2570 4390,2570 4450,2510 v3(4450,2105)
  Bottom Layer w60: 3455,1445 3490,1445 4420,1445 4455,1480
  other v1: 4420,1570 4450,1570 4480,1570 4450,1595 4479.53,1595
A_IN1: *1.9 JP2.6 | length 1436.6
  Top Layer w15: v1(5184,3670) 5184,3884 5240,3940 *1.9
  Bottom Layer w15: v1(5184,3670) 5185,3670 5215,3640 5215,3250 5116,3151 5116,2959 5130,2945 5285,2945 JP2.6
A_IN2: *1.10 JP2.5 | length 1439.2
  Top Layer w15: v1(5170,3570) 5170,3572.44 5150,3592.44 5150,3905 5190,3945 *1.10
  Bottom Layer w15: v1(5170,3570) 5170,3275 5015,3120 5015,2975.71 5076.71,2914 5216,2914 JP2.5
AM+: DRV8833.2 JP4.1 | length 307
  Top Layer w15: JP4.1 5079,2074 5265,2260 DRV8833.2
AM-: DRV8833.3 JP4.2 | length 307
  Top Layer w15: JP4.2 4955,2060 DRV8833.3
B_IN1: *1.11 JP2.2 | length 1298.4
  Top Layer w15: v1(5095.5,3635) 5095.5,3905.5 5140,3950 *1.11
  Bottom Layer w15: JP2.2 4955.82,2874.18 4955.82,2899.18 4916,2939 4916,3086 5120,3290 5120,3610.5 v1(5095.5,3635)
B_IN2: *1.12 JP2.1 | length 1299.6
  Top Layer w15: v1(5065,3535) 5066,3536 5066,3921 5090,3945 *1.12
  Bottom Layer w15: JP2.1 4815,2915 4815,3105 5065,3355 v1(5065,3535)
BM+: DRV8833.5 JP5.1 | length 304.9
  Bottom Layer w15: DRV8833.5 4974.18,2260.82 4974.18,2245.82 JP5.1
BM-: DRV8833.4 JP5.2 | length 304.9
  Bottom Layer w15: DRV8833.4 5074.18,2260.82 5074.18,2245.82 JP5.2
BOOT: *1.25 C8.1 EN.2 EN.4 R8.1 | length 1497.7
  Top Layer w15: v1(4800,4055) v1(4800,4230) ; *1.25 4990,3425.07 5030,3465.07 v1(5030,3500)
  Bottom Layer w15: EN.2 EN.4 ; v1(4800,4055) 5005,3850 5005,3525 v1(5030,3500)
  Bottom Layer w30: EN.4 4952.09,4227.48 5037.05,4227.48 C8.1 R8.1
C1A: *1.27 JP4.4 | length 1778.5
  Top Layer w15: JP4.4 4754.79,2050.21 4754.79,2140.21 4595,2300 4595,3085 4710,3200 5005,3200 5090,3285 *1.27@5090,3384.4
C1B: *1.30 JP5.3 | length 1593.2
  Top Layer w15: *1.30 5240,3245 5014,3019 5014,2786 5420,2380 5420,2100 JP5.3
C2A: *1.28 JP4.3 | length 1759.7
  Top Layer w15: JP4.3 4855,2160 4650,2365 4650,3060 4745,3155 5020,3155 5140,3275 *1.28
C2B: *1.31 JP5.4 | length 1554.3
  Top Layer w15: *1.31 5290,3205 5116,3031 5116,2814 5500,2430 5500,2082.78 5470,2052.78 JP5.4
EEP: *1.23 DRV8833.1 | length 1884.5
  Top Layer w15: v1(4820,3285) 4820,3421.56 4908.58,3510.14 4940.41,3510.14 *1.23
  Bottom Layer w15: v1(4820,3285) 4818.28,3283.28 4818.28,3268.28 4680,3130 4680,2670 4810,2540 5185,2540 5365,2360 DRV8833.1
EN: *1.3 BOOT.2 BOOT.4 C11.1 R10.1 | length 740.8
  Top Layer w15: v1(5535,4115) 5535,4112.56 5540,4107.56 *1.3
  Bottom Layer w15: BOOT.4@5280.87,4409.57 5535,4409.57 ; v1(5535,4115) C11.1 5535,4409.57 ; BOOT.2@5640,4409.57 5535,4409.57
GND: 0.2 0.4 1.2 1.4 2.2 2.4 *1.1 *1.15 *1.38 AMS1.1 BOOT.1 BOOT.3 C2.2 C3.2 C4.2 C5.2 C7.2 C8.2 C9.2 C10.2 C11.2 C12.2 C13.2 C14.2 C15.2 C16.2 D1.1 D2.1 D3.3 D4.3 D5.3 D6.3 D7.3 EN.1 EN.3 H?.2 JP2.4 JP4.5 JP5.6 L1.2 L3.2 MPU6050.2 pad.16@3990,2375 pad.16@3990,3070 pad.16@6240,2375 R4.1 R5.2 R6.2 R7.1 R22.1 R23.1 R24.1 R25.1 R26.1 U1.5 U1.9 U3.2 U3.3 U4.2 U4.3 U5.2 U5.3 U6.2 U6.3 U7.2 U7.3 UART.4 | length 91.2
  Top Layer w30: *1.1 5640,4100 v4(5655,4115)
  other v1: 4055,1555 4110,1555 4275,1555 4320,1555 4365,1555 3425,1575 3465,1575 3505,1575 3545,1575 3585,1575 3625,1575 3665,1575 4055,1600 4110,1600 4275,1600 4320,1600 4365,1600 3425,1615 3465,1615 3505,1615 3545,1615 3585,1615 3625,1615 3665,1615 3930,1640 4055,1645 4110,1645 4275,1645 4320,1645 4365,1645 3425,1655 3465,1655 3505,1655 3545,1655 3585,1655 3625,1655 3665,1655 3705,1655 4055,1690 4110,1690 4270,1690 4320,1690 4365,1690 3425,1695 3465,1695 3505,1695 3545,1695 3585,1695 3625,1695 3665,1695 3705,1695 3425,1735 3465,1735 3505,1735 3545,1735 3585,1735 3625,1735 3665,1735 3705,1735 3425,1775 3465,1775 3505,1775 3545,1775 3585,1775 3625,1775 3665,1775 3705,1775 3780,1780 3805,1780 3830,1780 3855,1780 3880,1780 4325,1790 4365,1790 3780,1805 3805,1805 3830,1805 3855,1805 3880,1805 3585,1815 3625,1815 3665,1815 3705,1815 3780,1830 3805,1830 3830,1830 3855,1830 3880,1830 4325,1830 4365,1830 4325,1875 4365,1875 4325,1915 4365,1915 4325,1955 4365,1955 3515,1995 3555,1995 3595,1995 4325,1995 4365,1995 3515,2035 3555,2035 3595,2035 4325,2035 4365,2035 3515,2075 3555,2075 3595,2075 4325,2075 4365,2075 3515,2115 3555,2115 3595,2115 3630,2115 3670,2115 3710,2115 3750,2115 3790,2115 3830,2115 3870,2115 3910,2115 3950,2115 3990,2115 4325,2120 4365,2120 3515,2155 3555,2155 3595,2155 3630,2155 3670,2155 3710,2155 3750,2155 3790,2155 3830,2155 3870,2155 3910,2155 3950,2155 3990,2155 4505,2330 4505,2380 4505,2430 4505,2480 4505,2535 4460,2580 4505,2580 4300,2625 4355,2625 4405,2625 4460,2625 5365,3065 5415,3065 5465,3065 5515,3065 5570,3065 5210,3085 5245,3120 5285,3160 5320,3225 5465,3255 5590,3255 5320,3275 5640,3290 5675,3290 5290,3430 5340,3430 5390,3430 5440,3430 5490,3430 5540,3430 5540,3465 5540,3500 5540,3535 5540,3570 5540,3605 5540,3640 5540,3675 5220,3695 5540,3710 5220,3735 5540,3745 5590,3745 5640,3745 5220,3770 5540,3780 5590,3780 5640,3780 5540,3815 5590,3815 5640,3815 5540,3850 5590,3850 5640,3850 5025,3875 5540,3885 5590,3885 5640,3885 5025,3920 5540,3920 5590,3920 5640,3920 5290,3955 5340,3955 5395,3955 5440,3955 5490,3955 5540,3955 5590,3955 5640,3955
  other v2: 4300,2330 4355,2330 4400,2330 4300,2380 4355,2380 4400,2380 4300,2430 4355,2430 4400,2430 4300,2475 4355,2475 4400,2475 4300,2515 4355,2515 5005,2645 5045,2645 5090,2645 5005,2685 5045,2685 5005,2725 5215,2780 5265,2780 5320,2780 5370,2780 4305,2875 4360,2875 4465,2880 4520,2880 4305,2930 4360,2930 4465,2930 4520,2930 4170,4535 4215,4535 4070,4575 4170,4575 4215,4575 4025,4615 4070,4615 4170,4615 4215,4615 4025,4655 4070,4655 4025,4695 4070,4695
  other v3: 4155,3900 4215,4460
NeoPixels: *1.37 Q1.2 R28.1 | length 1959.2
  Top Layer w15: *1.37 5592.37,3358.33 5592.37,3287.63 5645,3235 6005,3235 6075,3165 R28.1@6075,1927.4 ; Q1.2@5961.89,1927.56 6050.01,1927.56 6050.85,1926.71 6058.8,1926.71 6070,1915.51 R28.1
NetC1_1: C1.1 U1.8 | length 17.6
  Top Layer w15: U1.8@3900,1685 U1.8@3900,1702.56
NetC1_2: C1.2 D1.2 L2.1 U1.1
NetC6_1: C6.1 U1.3
NetC6_2: C6.2 R6.1
NetD3_2: D3.2 D4.4 | length 207.3
  Top Layer w30: D4.4 5728.27,1559.96 5855.43,1432.8 5867.28,1432.8 D3.2
NetD3_4: D3.4 R30.2 | length 191.7
  Top Layer w30: R30.2 5975,1714.33 6062.91,1626.42 D3.4
NetD4_2: D4.2 D5.4 | length 214
  Top Layer w30: D5.4 5375.22,1559.96 5502.42,1432.76 5520.83,1432.76 D4.2
NetD5_2: D5.2 D6.4 | length 212.9
  Top Layer w30: D6.4 5023.27,1559.96 5150.47,1432.76 5167.78,1432.76 D5.2
NetD6_2: D6.2 D7.4 | length 207.4
  Top Layer w30: D7.4 4676.81,1560 D6.2@4804.02,1432.8 ; D6.2@4804.02,1432.76 4806.73,1430.04 D6.2
NetF1_1: F1.1 S1.3
NetH?_1: H?.1 S1.1
NetL1_1: L1.1 R1.2 | length 195
  Top Layer w60: R1.2@6445,1240 L1.1
NetL3_1: L3.1 R11.2 | length 90
  Bottom Layer w15: L3.1 R11.2
NetQ1_3: Q1.3 R29.1 R30.1 | length 214.9
  Top Layer w30: Q1.3 5877.39,1889.12 5877.39,1775.25 R29.1 R30.1
NetR2_2: R2.2 R4.2 U1.2
NetR3_1: R3.1 R3.2 R7.2 U1.4
NetR5_1: R5.1 U1.6
NetR12_1: R12.1 U3.4 | length 161.2
  Top Layer w30: U3.4 6565.87,4539.13 6724.61,4539.13 R12.1
NetR14_1: R14.1 U4.4 | length 164
  Top Layer w30: U4.4 R14.1
NetR16_1: R16.1 U5.4 | length 159
  Top Layer w30: U5.4 R16.1
NetR18_1: R18.1 U6.4 | length 155.5
  Top Layer w30: U6.4 R18.1
NetR20_1: R20.1 U7.4 | length 180.5
  Top Layer w30: U7.4 R20.1
RXD0: *1.34 pad.3 UART.1 | length 166.1
  Top Layer w15: UART.1@5415,3205 5415,3275 5440,3300 *1.34
SCL: *1.36 MPU6050.3 | length 634.7
  Top Layer w15: MPU6050.3 5265,3059.44 5305.56,3100 5535,3100 5565,3130 5565,3285 5542.37,3307.63 5542.37,3358.33 *1.36
SDA: *1.33 MPU6050.4 | length 458.9
  Top Layer w15: MPU6050.4 5345,3175 5345,3265 5387.63,3307.63 5387.63,3358.33 *1.33
Sensor_1: *1.4 C12.1 R13.1 R22.2 U3.1 | length 1727.3
  Top Layer w15: *1.4 5490,4200 5590,4300 6255,4300 6350,4205 6515,4205 6565,4255 6565,4315 U3.1 6571.73,4315 C12.1 6725.97,4315.5 6725.97,4389.5 R22.2 6725.97,4390.5 6725.97,4464.5 R13.1
Sensor_2: *1.5 C13.1 R15.1 R23.2 U4.1 | length 1091.7
  Top Layer w15: *1.5@5440,4049.29 5440,4205 5585,4350 5745,4350 5865,4470 U4.1 5878.46,4535 C13.1@6028.02,4535 ; C13.1 6029.5,4535.5 6029.5,4611.17 R23.2 6029.5,4612.17 6029.5,4687.83 R15.1
Sensor_3: *1.6 C14.1 R17.1 R24.2 U5.1 | length 961.4
  Top Layer w15: R17.1 5324.5,4689.5 5324.5,4615.5 R24.2 5324.5,4614.5 5324.5,4540.5 C14.1 5173.46,4540 U5.1 5165,4395 5205,4355 5300,4355 5390,4265 *1.6@5390,4049.29
Sensor_4: *1.7 C15.1 R19.1 R25.2 U6.1 | length 1403.6
  Top Layer w15: U6.1 4473.46,4540 C15.1 ; R19.1 4620.97,4689.5 4620.97,4615.5 R25.2 4620.97,4614.5 4620.97,4540.5 C15.1 ; *1.7@5340,4049.29 5340,4245 5270,4315 4750,4315 4620,4445 4620,4539.53 C15.1
Sensor_5: *1.8 C16.1 R21.1 R26.2 U7.1 | length 1942.4
  Top Layer w15: U7.1 3823.46,4260 3945,4260 ; R21.1 R26.2 C16.1 3945,4260 ; *1.8@5290,4049.29 5290,4230 5260,4260 3945,4260
SW1: 0.1 0.3 *1.13 R27.1 | length 868.5
  Top Layer w15: 0.3 4321.48,3920.94 4678.52,3920.94 0.1 ; v1(4680.94,3995) 4680.94,3923.37 0.1 ; *1.13 5037.73,4027.73 5037.73,3976.92 5025.82,3965 4881.62,3965 4838.18,3921.56 0.1
SW2: 1.1 1.3 *1.16 R31.1 | length 786.8
  Top Layer w15: 1.3 1.1 4680,3634.36 4680,3705 4681.72,3706.72 4681.72,3736.72 4700,3755 4751.7,3755 4867.06,3870.35 *1.16
  other v1: 4681.89,3705
SW3: 2.1 2.3 *1.26 R32.1 | length 956.1
  Top Layer w15: 2.3 2.1 ; v1(4680,3425) 4680,3346.3 2.1 ; *1.26 5040,3300 4985,3245 4725,3245 4679.13,3290.87 2.1
TXD0: *1.35 pad.6 UART.2 | length 166.1
  Top Layer w15: *1.35 5490,3307.42 5515,3282.42 UART.2@5515,3205
UTL: *1.29 DRV8833.6 R9.2 | length 1513.1
  Top Layer w15: DRV8833.6 4870,2275 4870,2375 4710,2535 4710,3045 4775,3110 5040,3110 5190,3260 *1.29
  other v1: 4868.58,2375
VIN: C2.1 C3.1 D2.2 F1.2 JP2.3 R1.1 R2.1 U1.7 | length 2923.4
  Top Layer w37: R2.1 3935,2061.83 3935.2,2061.63 3968.33,2061.63 3990,2039.96 v1(3990,1975)
  Top Layer w60: v5(6185,1555) v5(6185,1635) ; 6185.34,1575.34 6251.38,1575.34 6255,1578.96 F1.2@6265.35,1578.96
  Bottom Layer w37: v1(3860,1535) 3968.33,1535 3990,1556.67 v1(3990,1975)
  Bottom Layer w60: JP2.3 5065,2745.15 5100.15,2710 5750,2710 6130,2330 6130,1690 v5(6185,1635)
  other v1: 3880,1535
WifiConfig: *1.24 R11.1 | length 107.4
  Top Layer w15: v1(4865,3419.8) 4866.72,3421.53 4881.53,3421.53 4918.76,3458.76 4918.76,3460.14 4928.98,3470.35 *1.24
pads on no net: *1.14 *1.17 *1.18 *1.19 *1.20 *1.21 *1.22 *1.32 *1.39 D7.2 MPU6050.5 MPU6050.6 MPU6050.7 MPU6050.8 S1.2 U3. U4. U5. U6. U7.

## Polygon pours and split planes (outlines as drawn)
GND on Top Layer "GND" (solid, remove dead copper, pour order 0): 3204.99,1990 cw(c3210,1990) 3210,1995.02 3482.4,1995.02 3480.06,3037.07 cw(c3485.07,3037.09) 3481,3040.01 4004.99,3777.69 4004.99,4104.98 3575.91,4104.69 3219.1,3597.12 cw(c3215,3600) 3214.61,3595 cw(c3209.6,3595) 3204.58,3595 3205.02,4236.61 cw(c3210.03,4236.61) 3205.32,4238.33 3332.99,4588.03 cw(c3337.7,4586.31) 3335.13,4590.61 3846.79,4898.02 cw(c3849.39,4893.72) 3849.36,4898.74 4968.13,4905.52 5106.93,5013.09 cw(c5110.01,5009.13) 5112.5,5013.48 cw(c5114.99,5009.13) 5118.07,5013.09 5256.52,4905.79 6375.17,4899.01 6375.19,4899.01 ccw(c6375.18,4898.84) 6375.17,4899.01 cw(c6375.15,4893.99) 6377.75,4898.29 6889.87,4590.61 cw(c6887.3,4586.31) 6892.01,4588.03 7019.68,4238.33 cw(c7014.97,4236.61) 7019.98,4236.61 7020.42,3595 cw(c7015.4,3595) 7010.39,3595 cw(c7010,3600) 7005.9,3597.12 6649.09,4104.69 6220.02,4104.98 6220.02,3775.73 6749.07,3042.94 cw(c6745,3040) 6750.02,3040 6750.02,1995.02 7015,1995.02 cw(c7015,1990) 7020.02,1990 cw(c7016.81,1989.99) 7020.01,1989.94 7020.01,1205 ccw(c7015,1205.03) 7020.01,1205.06 7020.02,1205 cw(c6980,1205) 6987.6,1165.71 cw(c6985,1170) 6985,1164.98 3260,1164.98 cw(c3260,1220) 3248.32,1166.24 cw(c3245,1170) 3245,1164.98 cw(c3245,1205) 3204.99,1205
GND on Bottom Layer "GND_L02_P002" (solid, remove dead copper, pour order 2): 3204.99,1990 cw(c3210,1990) 3210,1995.02 3482.4,1995.02 3480.06,3037.07 cw(c3485.07,3037.09) 3481,3040.01 4004.99,3777.69 4004.99,4104.98 3575.91,4104.69 3219.1,3597.12 cw(c3215,3600) 3214.61,3595 cw(c3209.6,3595) 3204.58,3595 3205.02,4236.61 cw(c3210.03,4236.61) 3205.32,4238.33 3332.99,4588.03 cw(c3337.7,4586.31) 3335.13,4590.61 3846.79,4898.02 cw(c3849.39,4893.72) 3849.36,4898.74 4968.13,4905.52 5106.93,5013.09 cw(c5110.01,5009.13) 5112.5,5013.48 cw(c5114.99,5009.13) 5118.07,5013.09 5256.52,4905.79 6375.17,4899.01 6375.19,4899.01 ccw(c6375.18,4898.84) 6375.17,4899.01 cw(c6375.15,4893.99) 6377.75,4898.29 6889.87,4590.61 cw(c6887.3,4586.31) 6892.01,4588.03 7019.68,4238.33 cw(c7014.97,4236.61) 7019.98,4236.61 7020.42,3595 cw(c7015.4,3595) 7010.39,3595 cw(c7010,3600) 7005.9,3597.12 6649.09,4104.69 6220.02,4104.98 6220.02,3775.73 6749.07,3042.94 cw(c6745,3040) 6750.02,3040 6750.02,1995.02 7015,1995.02 cw(c7015,1990) 7020.02,1990 cw(c7016.81,1989.99) 7020.01,1989.94 7020.01,1205 ccw(c7015,1205.03) 7020.01,1205.06 7020.02,1205 cw(c6980,1205) 6987.6,1165.71 cw(c6985,1170) 6985,1164.98 3260,1164.98 cw(c3260,1220) 3248.32,1166.24 cw(c3245,1170) 3245,1164.98 cw(c3245,1205) 3204.99,1205

## Keep-outs
Keep-Out Layer:
  lines w10: 3209.6,3595 3210.03,4236.61 3337.7,4586.31 3849.39,4893.72 4969.86,4900.51 5110.01,5009.13 ; 3210,1320 3210,1220 ccw(c3260,1220) 3260,1170 6985,1170 ; 3215,3600 3573.31,4109.7 4010,4110 4010,3776.09 3485.07,3037.09 3487.42,1992.62 ; 3487.42,1990 3210,1990 3210,1205 ; 5114.99,5009.13 5254.79,4900.79 6375.15,4894 6887.3,4586.31 7014.97,4236.61 7015.4,3595 ; 6980,1170 ccw(c6980,1205) 7015,1205 7015,1990 6745,1990 6745,3040 6215,3774.11 6215,4110 6651.69,4109.7 7010,3600 ; 3210,1205 ccw(c3245,1205) 3245,1170 cw(c3245,1205) 3210,1205

## Other copper
Top Layer:
  rectangle net GND: 3888.85,1754.1 3905.43,1849.88
  rectangle net GND: 3742.04,1754.1 3762.42,1849.88
  rectangle net +5: 4395.94,1542.28 4501.61,2160.08
  rectangle net VIN: 6260.26,1659.76 6335,1665
  rectangle net VIN: 6155,1275 6345,1665
  rectangle net NetR3_1: 3490,1890.75 3660,1960
  rectangle net NetC1_1: 3888.19,1665 4018.7,1704.97
  region net VIN: 3830,1570 3830,1197.07 ccw(c3847.07,1197.07) 3835,1185 3895,1185 3895,1600
  region net VIN: 3830,1570 3850,1570 cw(c3855,1570) 3855,1575 3895,1575 3895,1625 3865,1625 3865,1740 ccw(c3852.93,1727.93) 3852.93,1745 3845,1745 ccw(c3845,1732.93) 3836.46,1741.46 3835,1740 3836.46,1741.46 3830,1735
  region net VIN: 4030,1415 3870,1415 3870,1200 ccw(c3885,1200) 3885,1185 6380,1185 6380,1300 ccw(c6375,1300) 6375,1305 cw(c6375,1300) 6380,1300 6380,1277.5 ccw(c6377.5,1277.5) 6377.5,1280 4030,1280
  region net +5: 3530.04,1812.01 3532.96,1812.01 3537.07,1812.01 3537.76,1812.69 3537.76,1859.25 3490.51,1859.25 3370,1860 3345,1860 3340,1855 3340,1330 3345,1325 3505,1325 3515,1330 3515,1470 3505,1480 3400,1480 3390,1490 3390.16,1594.39 3390.16,1613.7 3390,1735 3390,1810 3460,1810 3495.3,1812.01 3512.29,1812.01
  region net NetF1_1: 6407.36,1533.78 6411.01,1530.13 6503.33,1530.13 6504.09,1529.37 6509.09,1534.37 6509.09,1814.37 6529.09,1834.37 6679.09,1834.37 6684.09,1839.37 6684.09,1894.37 6679.09,1899.37 6409.09,1899.37 6407.36,1897.64 6407.36,1891.11 6407.36,1573.99
  region net NetH?_1: 6715,1890 6720,1895 6770,1895 6775,1890 6775,1569.53 6746.26,1540.79 6647.83,1540.79 6647.83,1682.83 6715,1750
  region net NetR5_1: 3775.31,1570.93 3775,1570.61 3780,1565.61 3815,1565.61 3815,1744.39 3791.93,1744.39 3788.19,1740.65 3788.19,1633.8 3775.31,1620.93 3775.31,1614.31
  region net NetC6_2: 3814.02,2079.09 3810.61,2082.5 3706.3,2082.5 3706.3,2043.13
  region net NetC6_2: 3706.3,2043.13 3812.84,2043.13 3814.02,2044.32 3814.02,2079.09
  region net NetR3_1: 3761.31,1862.56 3761.57,1862.82 3761.57,1958.43 3760,1960 3670,1960 3668.7,1961.3 3668.7,2023.13 3631.61,2023.13 3631.3,2023.44 3630,2022.15 3630,1923.94 3612.56,1906.5 3612.56,1843.5 3723.5,1843.5 3739.98,1859.98 3738.86,1858.86 3758.27,1858.86 3761.63,1862.22 3761.63,1863.52
  region net NetC6_1: 3776.62,2020.26 3814.02,2020.26 3814.02,1864.63 3808.12,1858.73 3792.87,1858.73 3785,1866.6 3785,1983.87 3783.61,1985.26 3776.62,1985.26
  region net NetR2_2: 3953.7,1984.07 3953.7,2023.44 3846.3,2023.44 3843.44,2023.44 3838.19,2018.19 3838.19,1862.67 3842.2,1858.66 3858,1858.66 3861.35,1862.01 3865,1865.66 3865,1983.21 3865,1984.07 3882.82,1984.07
  region net NetC1_2: 3885,1935 3890,1940 4020,1940 4020,2195 4290,2195 4290,1950 4290,1735 4030,1735 4020,1725 3980,1725 3980,1860 3890,1860 3885,1865
Bottom Layer:
  region net +5: 4405,1640 4405,1505 4380,1475 4380,1415 4495,1415 4495,1640

## Silkscreen, mask and mechanical layers (free items; w line width, h text height)
Top Overlay:
  text "RX" at 5330,3250 h60
  text "TX" at 5535,3250 h60
  text "BIN2" at 4765,2755 h60
  text "BIN1" at 4890,2755 h60
  text "Vin" at 5020.06,2755 h60
  text "GND" at 5115,2750.67 h60
  text "AIN2" at 5245,2750 h60
  text "AIN1" at 5370,2750 h60
  text "BM-" at 5025,2175 h60
  text "AM-" at 5120,2175 h60
  text "AM+" at 5215,2175 h60
  text "EEP" at 5330,2175 h60
  text "UTL" at 4815,2170.67 h60
  text "BM+" at 4915,2170 h60
  text "VIN" at 6610,1330 h60
  text "GND" at 6795,1330 h60
Bottom Overlay:
  text "+5" at 5640,3290.67 h60
  text "GND" at 5785,3290.67 h60
  text "RX" at 5445,3290 h60
  text "TX" at 5540,3290 h60

## Text inside footprints (layer, text, board x,y; h text height)
*1: Mechanical 13 "ANTENNA" at 5787.24,3931.57 h70 r270